# Altium PCB Sound_Sensor_v3.0.PcbDoc (part 3 of 3)
Units mil, origin at the board's own origin, x right, y up, seen from the top; angles counter-clockwise.
Board outline 3553.2 x 3464.87 mil, 2 copper layers (Top Layer, Bottom Layer), stack 57 mil thick; 83 components, 60 nets, 303 pads, 73 vias.
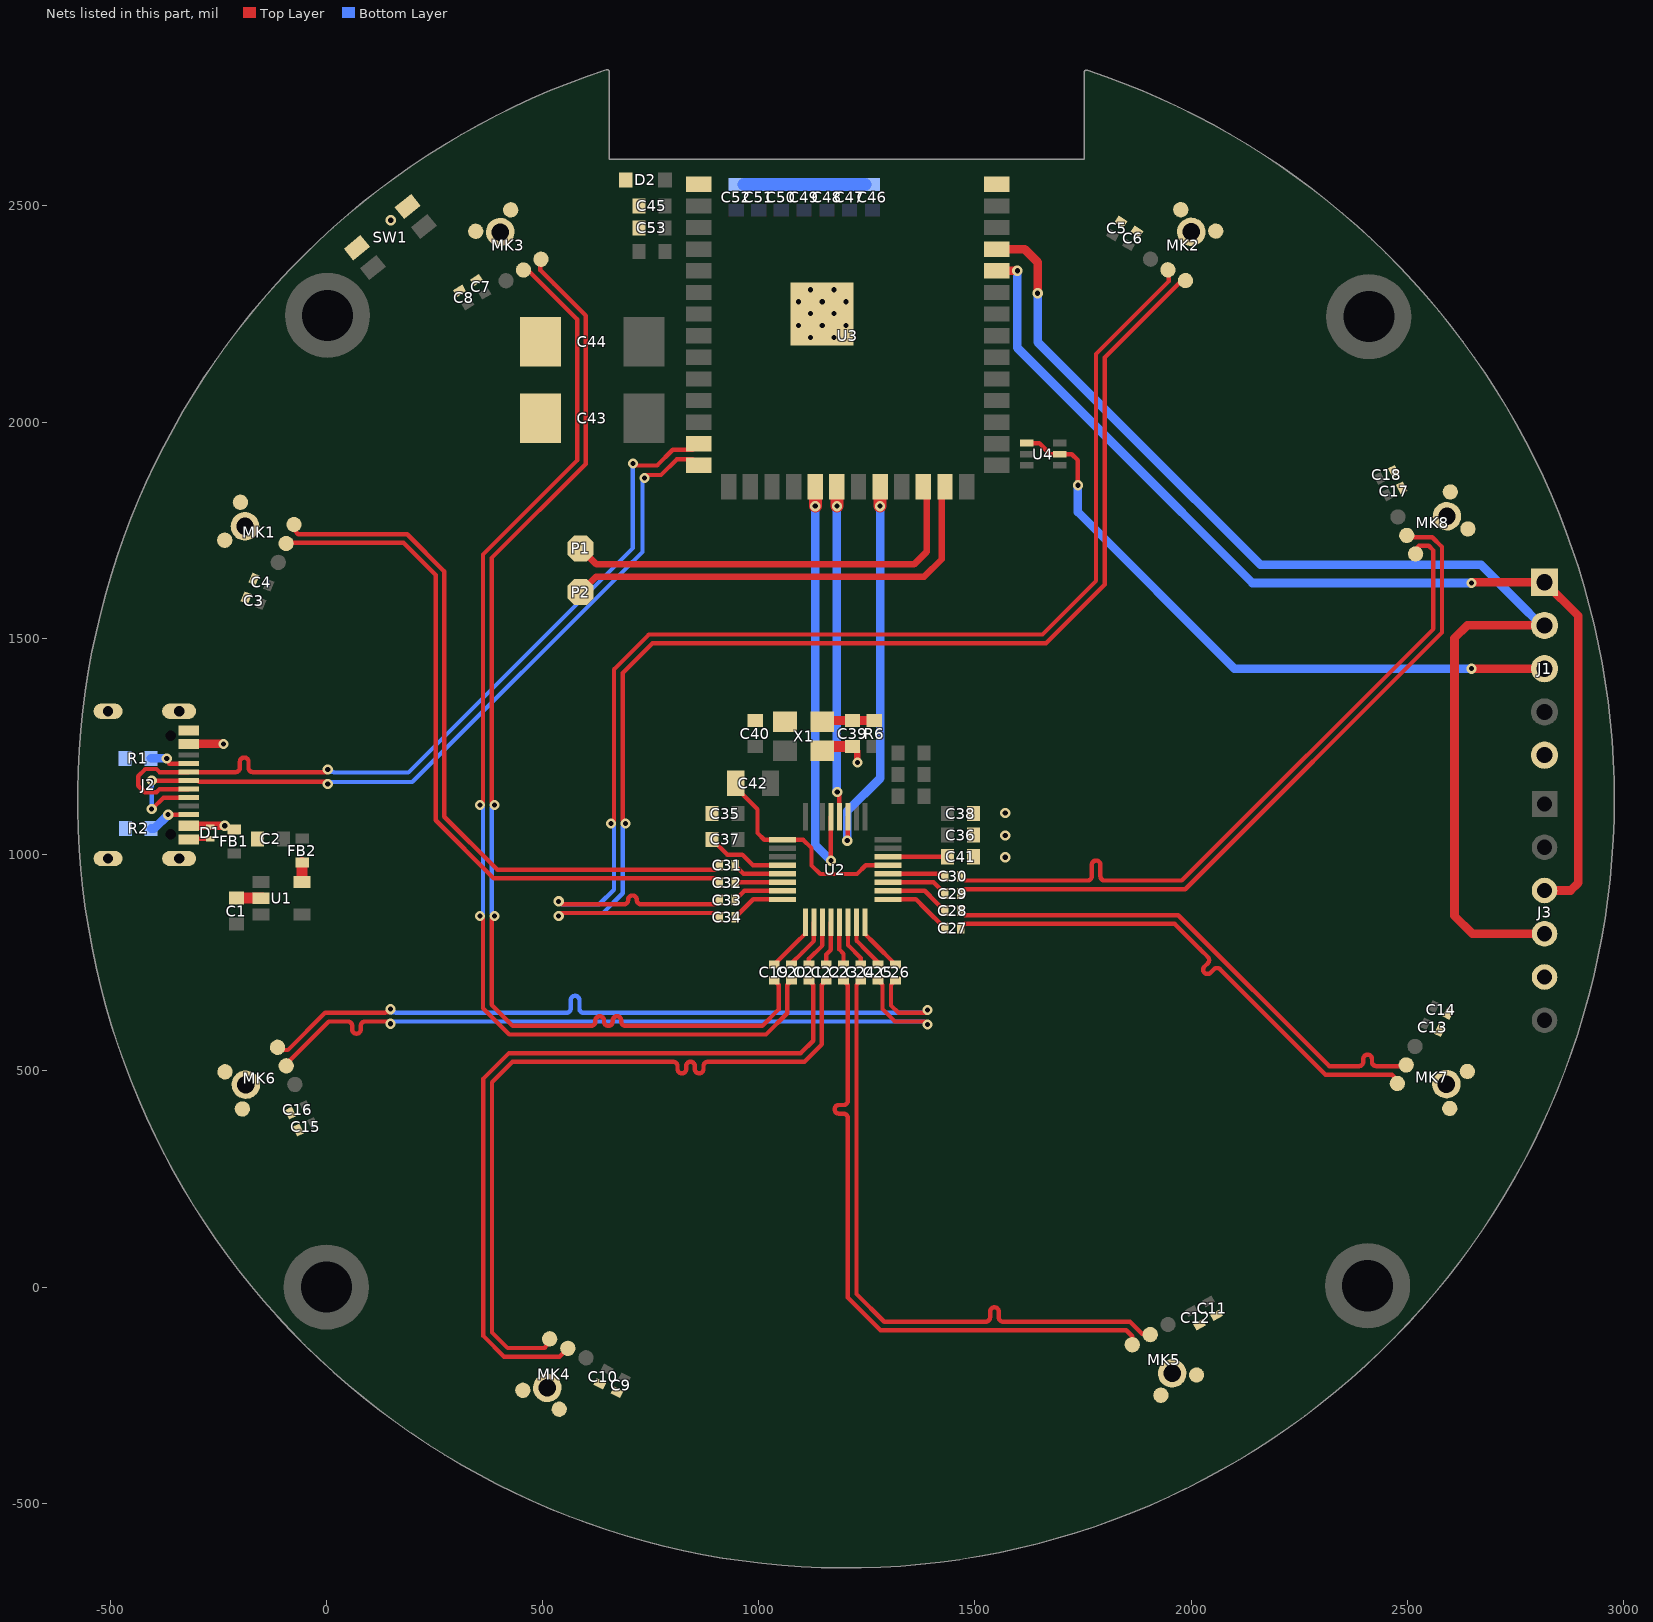
[diagram p2: the nets of this part, all layers, seen from the top]

## Via types
v1: diameter 23.62, hole 11.81, Top Layer to Bottom Layer, 73 vias

## Nets (pads, with @x,y where several pads share a name; then routed paths per layer and width w, separated by ;. In a path a pad name is that pad's centre, name@x,y a point inside that pad or via, vN(x,y) a via of type N, cw(c..) or ccw(c..) an arc to the next point about the centre after c; other vN are vias at no path point) (continued)
GND: C1.2 C2.2 C3.2 C4.2 C5.2 C6.2 C7.2 C8.2 C9.2 C10.2 C11.2 C12.2 C13.2 C14.2 C15.2 C16.2 C17.2 C18.2 C35.2 C36.2 C37.2 C38.2 C39.1 C40.1 C41.2 C42.1 C43.2 C44.2 C45.2 C46.2 C47.2 C48.2 C49.2 C50.2 C51.2 C52.2 C53.2 D1.1 D2.2 J1.5 J2.A1/B12 J2.B1/A12 J2.S1 J2.S2 J2.S3 J2.S4 J3.5 MK1.2 MK1.3 MK1.4 MK2.2 MK2.3 MK2.4 MK3.2 MK3.3 MK3.4 MK4.2 MK4.3 MK4.4 MK5.2 MK5.3 MK5.4 MK6.2 MK6.3 MK6.4 MK7.2 MK7.3 MK7.4 MK8.2 MK8.3 MK8.4 R1.1 R2.1 SW1.2 U1.2 U2.13 U2.25 U2.28 U3.1 U3.40 U3.41 X1.2 X1.4 | length 1158.8
  Top Layer w10: J2.B1/A12@-313.25,1036.94 D1.1@-264.8,1036.94 ; C37.2@892,1035 927,1000 962,1000 986.61,975.39 U2.28@1054.64,975.39 ; C42.1@947,1155 997,1105 997,1050 1012.55,1034.45 U2.25@1054.64,1034.45 1102.55,1034.45 1122,1015 1122,975 1142,955 1227,955 1247.39,975.39 U2.13@1298.73,975.39
  Top Layer w15: C39.1@1217,1250 1228.34,1238.66 v1(1228.34,1213)
  Top Layer w25: -190.29,899.72 U1.2@-148.21,899.72 ; X1.4@1156.41,1250 C39.1@1217,1250
  Bottom Layer w30: 965.5,2550 C51.2@1000,2550 C50.2@1052,2550 C49.2@1105,2550 C48.2@1158,2550 C47.2@1210,2550 C46.2@1245.5,2550
  other v1: 1570,994 1570,1044 1570,1096 1119.23,2195.88 1174.35,2195.88 1091.67,2223.44 1146.79,2223.44 1201.91,2223.44 1119.23,2251 1174.35,2251 1091.67,2278.56 1146.79,2278.56 1201.91,2278.56 1119.23,2306.12 1174.35,2306.12 149,2467
IO19: P1.1 U3.24 | length 970.8
  Top Layer w15: P1.1@588,1707.98 624.98,1671 682,1671 1359,1671 1388,1700 U3.24@1388,1843.5
IO20: P2.1 U3.25 | length 1026.6
  Top Layer w15: P2.1@588,1607 624,1643 695,1643 1383,1643 1423,1683 U3.25@1423,1843.08
MIC_OUTS.OUT1_N: C32.1 MK1.6 | length 1659.9
  Top Layer w10: MK1.6@-92.86,1719.58 -91.45,1720.98 178.73,1720.98 253,1646.72 253,1079.31 387.31,945 898.5,945 C32.1@908.5,935
MIC_OUTS.OUT1_P: C31.1 MK1.1 | length 1657.1
  Top Layer w10: MK1.1@-74.72,1763.37 -72.01,1756.84 -72.01,1748.32 -64.68,1740.98 187.02,1740.98 273,1655 273,1087.59 395.59,965 461.71,965 530.48,965 898.5,965 C31.1@908.5,975
MIC_OUTS.OUT2_N: C33.1 MK2.6 | length 3050.7
  Top Layer w10: v1(537.32,891.98) 544.13,885.17 548.43,885.17 548.6,885 682.99,885 687.99,885 ccw(c687.99,895) 697.99,895 697.99,895.65 cw(c707.99,895.65) 717.99,895.65 717.99,895 ccw(c727.99,895) 727.99,885 769.28,885 898.5,885 C33.1@908.5,895 ; v1(658.51,1071.98) 665.32,1078.8 665.32,1428.32 746,1509 1656,1509 1780,1633 1780,2157.66 1947.84,2325.5 1947.84,2345.33 MK2.6@1946.19,2352.2
  Bottom Layer w10: v1(537.32,891.98) 544.13,885.17 548.43,885.17 548.6,885 631.34,885 665.32,918.98 665.32,1022.98 665.32,1065.17 v1(658.51,1071.98)
MIC_OUTS.OUT2_P: C34.1 MK2.1 | length 3055
  Top Layer w10: v1(537.32,858.36) 537.32,865.17 540.14,865.17 540.32,865 898.5,865 C34.1@908.5,855 ; v1(692.13,1071.98) 685.32,1078.8 685.32,1420.04 754.28,1489 1664.28,1489 1800,1624.72 1800,2149.38 1976.41,2325.78 1979.73,2325.78 MK2.1@1986.6,2327.44
  Bottom Layer w10: v1(537.32,858.36) 537.32,865.17 540.14,865.17 540.32,865 639.62,865 685.32,910.7 685.32,1065.17 v1(692.13,1071.98)
MIC_OUTS.OUT3_N: C20.1 MK3.6 | length 2694.5
  Top Layer w10: v1(355.51,857.98) 362.32,851.17 362.32,644.7 423.04,583.98 1016.61,583.98 1066,633.38 1066,699 C20.1@1076,709 ; v1(355.51,1114.98) 362.32,1121.8 362.32,1693.98 580,1911.66 580,2238.02 518.04,2299.98 467.82,2350.2 462.89,2350.2 MK3.6@456.02,2351.85
  Bottom Layer w10: v1(355.51,857.98) 362.32,864.8 362.32,1108.17 v1(355.51,1114.98)
MIC_OUTS.OUT3_P: C19.1 MK3.1 | length 2701.8
  Top Layer w10: v1(389.13,857.98) 382.32,851.17 382.32,652.98 431.32,603.98 570.18,603.98 612.15,603.98 ccw(c612.15,613.98) 622.15,613.98 622.15,616.27 cw(c632.15,616.27) 642.15,616.27 642.15,613.98 ccw(c652.15,613.98) 662.15,613.98 662.15,616.27 cw(c672.15,616.27) 682.15,616.27 682.15,613.98 ccw(c692.15,613.98) 692.15,603.98 717.15,603.98 1008.32,603.98 1046,641.66 1046,699 C19.1@1036,709 ; v1(389.13,1114.98) 382.32,1121.8 382.32,1685.7 600,1903.38 600,2246.31 526.32,2319.98 494.78,2351.52 494.78,2369.74 MK3.1@496.43,2376.62 MK3.1@503.31,2374.97
  Bottom Layer w10: v1(389.13,857.98) 382.32,864.8 382.32,1108.17 v1(389.13,1114.98)
MIC_OUTS.OUT4_N: C21.1 MK4.6 | length 1760.8
  Top Layer w10: MK4.6@558.56,-141.63 539.17,-161.02 497.08,-161.02 411.04,-161.02 363.32,-113.3 363.32,481.98 422.32,540.98 1097.32,540.98 1126,569.66 1126,699 C21.1@1116,709
MIC_OUTS.OUT4_P: C22.1 MK4.1 | length 1762.7
  Top Layer w10: MK4.1@516.51,-119.74 505.44,-141.02 419.32,-141.02 383.32,-105.02 383.32,473.7 430.61,520.98 777.19,520.98 802.19,520.98 cw(c802.19,510.98) 812.19,510.98 812.19,504.34 ccw(c822.19,504.34) 832.19,504.34 832.19,510.98 cw(c842.19,510.98) 852.19,510.98 852.19,504.34 ccw(c862.19,504.34) 872.19,504.34 872.19,510.98 cw(c882.19,510.98) 882.19,520.98 927,520.98 1105.61,520.98 1146,561.38 1146,699 C22.1@1156,709
MIC_OUTS.OUT5_N: C24.1 MK5.6 | length 1495.9
  Top Layer w10: C24.1@1236,709 1226,699 1226,-16 1290,-80 1507.45,-80 1525,-80 ccw(c1525,-70) 1535,-70 1535,-56.79 cw(c1545,-56.79) 1555,-56.79 1555,-70 ccw(c1565,-70) 1565,-80 1590,-80 1858.28,-80 1886.35,-108.06 1898.28,-108.06 MK5.6@1905.09,-109.95
MIC_OUTS.OUT5_P: C23.1 MK5.1 | length 1495.8
  Top Layer w10: C23.1@1196,709 1206,699 1206,456.09 1206,431.09 cw(c1196,431.09) 1196,421.09 1185.41,421.09 ccw(c1185.41,411.09) 1185.41,401.09 1196,401.09 cw(c1196,391.09) 1206,391.09 1206,370 1206,-24.28 1281.72,-100 1850,-100 1863.84,-113.84 MK5.1@1863.84,-133.29
MIC_OUTS.OUT6_N: C25.1 MK6.6 | length 1763.2
  Top Layer w10: MK6.6@-92.66,511.52 -90.24,518.17 -90.24,518.42 5.51,614.17 24.78,614.17 49.78,614.17 cw(c49.78,604.17) 59.78,604.17 59.78,595.91 ccw(c69.78,595.91) 79.78,595.91 79.78,604.17 cw(c89.78,604.17) 89.78,614.17 118.57,614.17 143.13,614.17 v1(148.32,608.98) ; C25.1@1276,709 1286,699 1286,643.02 1314.85,614.17 1383.51,614.17 v1(1390.32,607.36)
  Bottom Layer w10: v1(148.32,608.98) 153.51,614.17 1383.51,614.17 v1(1390.32,607.36)
MIC_OUTS.OUT6_P: C26.1 MK6.1 | length 1776.2
  Top Layer w10: MK6.1@-112.69,554.48 -106.05,552.07 -102.11,548.13 -88.82,548.13 -2.77,634.17 135.6,634.17 137.22,635.8 148.32,635.8 v1(148.32,642.61) ; C26.1@1316,709 1306,699 1306,651.31 1323.13,634.17 1383.51,634.17 v1(1390.32,640.98)
  Bottom Layer w10: v1(148.32,642.61) 148.32,635.8 159.43,635.8 161.05,634.17 513.06,634.17 555.32,634.17 ccw(c555.32,644.17) 565.32,644.17 565.32,663.57 cw(c575.32,663.57) 585.32,663.57 585.32,644.17 ccw(c595.32,644.17) 595.32,634.17 620.32,634.17 1383.51,634.17 v1(1390.32,640.98)
MIC_OUTS.OUT7_N: C28.1 MK7.6 | length 1215.1
  Top Layer w10: C28.1@1467,870 1477,860 1970,860 2319.02,510.98 2382.93,510.98 2387.93,510.98 ccw(c2387.93,520.98) 2397.93,520.98 2397.93,527.44 cw(c2407.93,527.44) 2417.93,527.44 2417.93,520.98 ccw(c2427.93,520.98) 2427.93,510.98 2454.36,510.98 2490.21,510.98 2490.5,511.27 MK7.6@2497.16,513.63
MIC_OUTS.OUT7_P: C27.1 MK7.1 | length 1215.9
  Top Layer w10: C27.1@1467,830 1477,840 1961.72,840 2020.86,780.86 2038.54,763.18 cw(c2031.46,756.11) 2038.54,749.04 2030.63,741.13 ccw(c2037.7,734.06) 2030.63,726.99 ccw(c2037.7,734.06) 2044.77,726.99 2052.68,734.9 cw(c2059.75,727.82) 2066.82,734.9 2081.65,720.07 2310.73,490.98 2464.32,490.98 2474.39,480.91 2474.39,477.51 MK7.1@2476.75,470.84
MIC_OUTS.OUT8_N: C29.1 MK8.6 | length 1652.9
  Top Layer w10: C29.1@1467,910 1477,920 1986.28,920 2580,1513.72 2580,1711.59 2557.61,1733.98 2506.96,1733.98 2505.17,1735.78 MK8.6@2498.5,1738.14
MIC_OUTS.OUT8_P: C30.1 MK8.1 | length 1654.2
  Top Layer w10: C30.1@1467,950 1477,940 1755,940 1760,940 ccw(c1760,950) 1770,950 1770,976.43 cw(c1780,976.43) 1790,976.43 1790,950 ccw(c1800,950) 1800,940 1819.3,940 1978,940 2560,1522 2560,1703.31 2549.32,1713.98 2526.75,1713.98 2521.27,1708.51 2521.27,1702.02 MK8.1@2518.91,1695.36
MISO: U2.20 U3.20 | length 759.4
  Top Layer w10: v1(1181.53,1145) 1186.53,1140 U2.20@1186.53,1087.6
  Top Layer w30: v1(1180.71,1805.71) U3.20@1180.71,1850.79
  Bottom Layer w20: v1@1180.71,1150.82 v1(1180.71,1805.71)
MOSI: U2.21 U3.19 | length 970.6
  Top Layer w10: v1@1166.84,996.84 U2.21@1166.84,1087.6
  Top Layer w30: v1(1130.71,1805.71) U3.19@1130.71,1850.79
  Bottom Layer w20: v1(1130.71,1805.71) 1130.71,1022.29 v1(1167,986)
NetC19_2: C19.2 U2.1 | length 101.5
  Top Layer w10: C19.2@1036,746 1085,795 U2.1@1107.79,817.79
NetC20_2: C20.2 U2.2 | length 115.8
  Top Layer w10: C20.2@1076,749 1102,775 1127.47,800.47 U2.2@1127.47,843.5
NetC21_2: C21.2 U2.3 | length 110.4
  Top Layer w10: C21.2@1116,746 1116,759 1147.16,790.16 U2.3@1147.16,843.5
NetC22_2: C22.2 U2.4 | length 102
  Top Layer w10: C22.2@1156,746 1156,769 1166.84,779.84 U2.4@1166.84,843.5
NetC23_2: C23.2 U2.5 | length 101.4
  Top Layer w10: U2.5@1186.53,843.5 1186.53,780.47 1196,771 C23.2@1196,746
NetC24_2: C24.2 U2.6 | length 109.8
  Top Layer w10: U2.6@1206.21,843.5 1206.21,790.79 1236,761 C24.2@1236,746
NetC25_2: C25.2 U2.7 | length 113.3
  Top Layer w10: U2.7@1225.9,843.5 1225.9,801.1 1251.5,775.5 C25.2@1276,751
NetC26_2: C26.2 U2.8 | length 99.6
  Top Layer w10: U2.8@1245.58,816.42 1267,795 C26.2@1316,746
NetC27_2: C27.2 U2.9 | length 158.9
  Top Layer w10: U2.9@1298.73,896.65 1363.35,896.65 1385,875 C27.2@1430,830
NetC28_2: C28.2 U2.10 | length 150.5
  Top Layer w10: U2.10@1298.73,916.34 1383.66,916.34 1410,890 C28.2@1430,870
NetC29_2: C29.2 U2.11 | length 142
  Top Layer w10: U2.11@1298.73,936.02 1403.98,936.02 C29.2@1430,910
NetC30_2: C30.2 U2.12 | length 125.6
  Top Layer w10: U2.12@1298.73,955.71 C30.2@1424.29,955.71
NetC31_2: C31.2 U2.29 | length 117.1
  Top Layer w10: C31.2@945.5,975 964.79,955.71 U2.29@1054.64,955.71
NetC32_2: C32.2 U2.30 | length 108.1
  Top Layer w10: C32.2@946.52,936.02 U2.30@1054.64,936.02
NetC33_2: C33.2 U2.31 | length 118
  Top Layer w10: C33.2@945.5,895 966.84,916.34 U2.31@1054.64,916.34
NetC34_2: C34.2 U2.32 | length 100.4
  Top Layer w10: C34.2@945.5,855 987.15,896.65 U2.32@1028.65,896.65
NetC39_2: C39.2 R6.2 X1.1 | length 117.5
  Top Layer w20: X1.1@1149.48,1310 C39.2@1217,1310 R6.2@1267,1310
NetFB2_1: FB2.1 U1.5 | length 45
  Top Layer w25: U1.5@-56.29,936.46 FB2.1@-56.29,981.42
NetJ2_A5: J2.A5 R1.2 | length 101.1
  Top Layer w10: v1(-368.8,1222.48) -370.8,1222.48 -372.8,1220.48 -362.79,1210.47 J2.A5@-317.67,1210.47
  Bottom Layer w20: R1.2@-405.8,1222.47 v1(-368.8,1222.48)
NetJ2_B5: J2.B5 R2.2 | length 100.3
  Top Layer w10: v1(-365.68,1092.36) J2.B5@-317.67,1092.36
  Bottom Layer w20: R2.2@-404.8,1060.46 -397.58,1060.46 v1(-365.68,1092.36)
REFIN: C41.1 U2.14 | length 138.2
  Top Layer w10: U2.14@1298.73,995.08 C41.1@1436.92,995.08
RTS: J1.3 U4.1 U4.5 | length 1483.5
  Top Layer w10: U4.1@1619.81,1951.59 1648.41,1951.59 1674,1926 U4.5@1696.19,1926 1724,1926 1738,1912 v1(1738,1854)
  Top Layer w20: v1(2648,1430) J1.3@2817.01,1430
  Bottom Layer w20: v1(1738,1854) 1738,1792 2100,1430 v1(2648,1430)
RX: J1.1 J3.3 U3.36 | length 2484.2
  Top Layer w20: U3.36@1550,2350 v1(1598,2350) ; v1(2648,1628.19) 2648.98,1628.19 2650.79,1630 J1.1@2817.01,1630 2895.32,1551.69 2895.32,934.98 2877.35,917.01 J3.3@2817.01,917.01
  Bottom Layer w20: v1(1598,2350) 1598,2172 1820,1950 2141.81,1628.19 v1(2648,1628.19)
SCLK: U2.19 U3.22 | length 903.9
  Top Layer w10: v1@1205.48,1032.98 U2.19@1205.48,1086.87
  Top Layer w30: v1(1280.71,1805.71) U3.22@1280.71,1850.79
  Bottom Layer w20: v1(1204.75,1032.25) 1204.75,1100.75 1280.71,1176.71 v1(1280.71,1805.71)
TX: J1.2 J3.4 U3.37 | length 2823.4
  Top Layer w20: U3.37@1550,2400 1615,2400 1645,2370 v1(1645,2298) ; J3.4@2817.01,817.01 2650.3,817.01 2609,858.31 2609,1500.66 2638.34,1530 J1.2@2817.01,1530
  Bottom Layer w15: J1.2@2810,1530 J1.2@2817.01,1530
  Bottom Layer w20: v1(1645,2298) 1645,2185 1860,1970 2160,1670 2670,1670 2755,1585 J1.2@2810,1530
USB.USB_N: J2.A7 J2.B7 U3.13 | length 1919.5
  Top Layer w10: J2.A7@-317.67,1151.42 -385.63,1151.42 -392.69,1144.36 -419.67,1144.36 -434.8,1159.48 -434.8,1181.48 -418.3,1197.98 -392.69,1197.98 -385.5,1190.79 J2.B7@-317.67,1190.79 ; -294.05,1190.8 -214.86,1190.8 -209.86,1190.8 ccw(c-209.86,1200.8) -199.86,1200.8 -199.86,1214.62 cw(c-189.86,1214.62) -179.86,1214.62 -179.86,1200.8 ccw(c-169.86,1200.8) -169.86,1190.8 -151.6,1190.8 -2.49,1190.8 v1(3.32,1196.61) ; v1(709,1904.62) 713.81,1899.81 720.93,1899.81 765.04,1899.81 801.23,1936 847.02,1936 U3.13@861.02,1950
  Bottom Layer w10: v1(3.32,1196.61) 8.13,1191.8 15.26,1191.8 17.26,1189.8 189.8,1189.8 709,1709 v1(709,1904.62)
USB.USB_P: J2.A6 J2.B6 U3.14 | length 1829.8
  Top Layer w10: v1(-403.8,1171.17) -403.14,1171.82 -402.42,1171.1 J2.A6@-317.67,1171.1 ; v1@-402.8,1105.48 -376.54,1131.73 J2.B6@-317.67,1131.73 ; -294.05,1168.8 -2.49,1168.8 v1(3.32,1162.98) ; v1(735.81,1871) 735.81,1877.81 774.15,1877.81 810.34,1914 847.02,1914 U3.14@861.02,1900
  Bottom Layer w10: v1(-403.8,1105.48) v1(-403.8,1171.17) ; v1(3.32,1162.98) 3.32,1167.8 198.91,1167.8 709,1677.89 731,1699.89 731,1871 v1(735.81,1871)
VBUS: D1.2 FB1.1 J2.A4/B9 J2.B4/A9 | length 152.5
  Top Layer w20: J2.B4/A9@-314.68,1067.01 -264.8,1067.01 v1@-238.8,1067.01 ; J2.A4/B9@-314.68,1255.98 v1@-238.07,1255.98
  other v1: -234.8,1066.72 -237.8,1255.72
pads on no net: J2.A8 J2.B8 J2.MH U1.4 U2.27 U3.4 U3.5 U3.6 U3.7 U3.8 U3.9 U3.10 U3.11 U3.12 U3.15 U3.16 U3.23 U3.26 U3.28 U3.29 U3.30 U3.31 U3.32 U3.33 U3.34 U3.35 U3.38 U3.39

## Polygon pours and split planes (outlines as drawn)
no net on Bottom Overlay "NONET_L-01_P-001" (solid): 1125.98,447.59 cw(c1002.43,44.62) 1413.98,135.59 cw(c1774.85,0.77) 1534.2,301.59 1533.98,302.59 1519.86,422.59 1425.92,322.59 1424.98,321.59 ccw(c615.16,-321.74) 1212.48,522.59
no net on Bottom Overlay "NONET_L-01_P-001" (solid): 1243.71,109.54 ccw(c1372,299) 1143.8,315.66 1165.78,313.59 cw(c1372,299) 1269.28,119.59
GND on Top Layer "GND_L01_P001" (solid, remove dead copper, pour order 1): 625,2760.71 ccw(c1201.18,1127.06) 1785,2758 1785,2575 625,2575
GND on Bottom Layer "GND_L02_P000" (solid, remove dead copper, pour order 0): 625.32,2760.71 ccw(c1201.5,1127.06) 1785.32,2758 1785.32,2575 625.32,2575

## Other copper
Top Layer:
  rectangle net 3V3: 635,1951.93 735.08,2395
  region net 3V3: 192.23,1108.77 160.5,1140.5 120,1100 151.73,1068.27
  rectangle net 3V3: 697,1981 773,2214
  region net GND: 1949,2446 1848.54,2507.56 1828.67,2475.14 1929.13,2413.58
  region net GND: 2491.78,1829.52 2554.7,1859.53 2523,1926 2460.08,1895.99
  region net GND: 2631,1851 2581.73,1954.29 2511.14,1920.62 2560.4,1817.33
  region net GND: 1904.49,2463.99 1845.05,2500.42 1825.18,2467.99 1884.62,2431.57
  region net GND: 374.13,2398.42 273.47,2336.74 293.34,2304.32 394,2366
  region net GND: 340.12,2364.73 279.2,2327.39 299.07,2294.97 359.99,2332.31
  region net GND: -186.13,1708.55 -231.23,1599.66 -196.1,1585.11 -151,1694
  region net GND: -194.44,1662.18 -221.93,1595.81 -186.8,1581.26 -159.31,1647.63
  region net GND: -148.46,435.93 -100.1,332.22 -65.64,348.29 -114,452
  region net GND: -57.54,352.07 -87,415.25 -121.46,399.18 -92,336
  region net GND: 659.87,-294.88 558.36,-242.04 522.25,-311.42 623.75,-364.26
  region net GND: 683.4,-248.46 621.56,-216.27 587.56,-281.59 649.39,-313.78
  region net GND: 2026.96,-126.35 2087.63,-92.02 2068.91,-58.93 2008.23,-93.26
  region net GND: 1991.72,-155.1 2091.32,-98.74 2072.6,-65.65 1973,-122
  region net GND: 2592,522 2641.27,625.29 2606.94,641.66 2557.68,538.37
  rectangle net GND: -324.8,1295.29 -307.55,1334.54
  region net "DEBUG SIG.ENABLE": 226.97,2472.33 83.67,2356.29 133.73,2294.47 277.02,2410.51
  region net 3V3: 418.51,2334.93 316.19,2272.23 337.09,2238.13 439.41,2300.83
  region net GND: 426.6,2531.22 309.64,2459.54 374.32,2353.98 491.28,2425.66
  region net GND: -221.56,1847.1 -274.06,1720.36 -159.68,1672.98 -107.18,1799.72
  region net 3V3: -113.71,1683.16 -159.63,1572.29 -95.42,1545.7 -49.5,1656.56
  region net 3V3: -81.11,472.48 -31.04,365.11 54.07,404.81 4.01,512.17
  region net GND: -273.88,502.66 -215.91,378.34 -103.7,430.66 -161.68,554.98
  region net GND: 1928.32,-290.02 2047.71,-222.47 1986.75,-114.71 1867.36,-182.26
  region net 3V3: 1947.58,-92.92 2054.75,-32.28 1982.52,95.37 1875.35,34.74
  region net GND: 2603.46,565.47 2633.47,628.39 2599.15,644.76 2569.14,581.84
  region net 3V3: 2518.77,546.45 2571.97,658 2507.54,688.73 2454.33,577.19
  region net GND: 2619.07,379.69 2678.12,503.5 2566.38,556.8 2507.32,432.98
  region net GND: 420.75,-258.48 542.43,-321.82 578.41,-252.68 456.74,-189.34
  region net 3V3: 588.88,-165.61 695.32,-221.02 741.31,-132.67 634.87,-77.26
  region net 3V3: 2485.96,1774.73 2434.3,1883.04 2370.21,1852.46 2421.87,1744.15
  region net GND: 2679.32,1748.98 2620.27,1872.8 2549.42,1839.01 2608.48,1715.19
  region net GND: 2092.32,2458.98 1975.36,2530.66 1910.67,2425.1 2027.64,2353.43
  region net 3V3: 1914.61,2380.17 1812.3,2442.87 1775.76,2383.24 1878.07,2320.54
  region net GND: 168.73,2500.15 66.26,2417.17 83.07,2396.4 185.55,2479.38
  rectangle net 3V3: 1367,1033 1452,1245
  rectangle net GND: 1073.62,2177.17 1219.29,2322.83
  rectangle net VBUS: -237.68,1046.22 -197.04,1080.98
  rectangle net 5V: -222.8,824.72 -100.8,856.72
  rectangle net 3V3: -110.8,1025.24 -44.68,1103
  rectangle net 5V: -225.8,935.72 -100.8,997.72
  rectangle net GND: -324.8,983.54 -307.55,1027.72
Bottom Layer:
  rectangle net VBUS: -258.8,1048.72 -216.8,1272.72

## Silkscreen, mask and mechanical layers (free items; w line width, h text height)
Top Overlay:
  region: 2590.99,885 2545.02,930.97 2545.02,839.03
  region: 2589.99,1450 2544.02,1495.97 2544.02,1404.03
  lines w5: -147.8,1015.48 -111.8,1015.48 ; -147.8,1057.48 -133.8,1057.48 -111.8,1057.48 ; -133.8,1060.48 -133.8,1105.48 -113.8,1105.48 ; 853,1042 873,1042 873,1035 ; 870,983 896,983 896,975 ; 881,931 896,931 896,935 ; 884,889 896,889 896,895 ; 958,855 980,855 980,832 ; 988,684 988,706.5 1020,706.5 ; 1116,696.5 1118,696.5 1118,568 ; 1196,696.5 1198,696.5 1198,568 ; 1276,696.5 1278.02,696.5 1278.02,686 ; 1315,696.5 1316,696.5 ; 1332,706.5 1363,706.5 ; 1386.08,1256 1387,1256 1387,1270 1417,1270 ; 1400,1143.52 1417,1143.52 ; 1400,1197.39 1416,1197.39 ; 1479.5,905 1617,905 ; 1479.5,941.34 1479.5,940 1494,940
  lines w10: 391,1545 651,1545 651,1775 391,1775 391,1545
  lines w20: 2390.02,1450 2544.02,1450 ; 2391.02,885 2545.02,885
  text "RX" at 2677.69,1599.31 h40
  text "TX" at 2677.69,1499.31 h40
  text "RTS" at 2660.1,1399.31 h40
  text "TEST POINTs" at 361,1395 h90
  text "DTR" at 2655.76,1299.31 h40
  text "GND" at 2649.07,1199.31 h40
  text "PROGRAMMING" at 2389.32,1122.98 h90 r90
  text "EN" at 2655.01,1092 h40
  text "IO_0" at 2653.1,986.31 h40
  text "RX" at 2678.01,892 h40
  text "USB" at -391.8,793.48 h90 r90
  text "TX" at 2678.01,789 h40
  text "DEBUG" at 2389.32,723.98 h90 r90
  text "GND" at 2650.01,686 h40
  text "3V3" at 2650.01,586 h40
Bottom Overlay:
  lines w5: 1424.98,321.59 ccw(c615.16,-321.74) 1212.48,522.59 1125.98,447.59 cw(c1002.43,44.62) 1413.98,135.59 cw(c1774.85,0.77) 1534.2,301.59 ; 1425.92,322.59 1519.86,422.59 1533.98,302.59 ; 1143.8,315.66 cw(c1372,299) 1243.71,109.54 1269.28,119.59 ccw(c1372,299) 1165.78,313.59 1143.8,315.66
  lines w10: 2763,567 2867,567 2867,1172 2763,1172 2763,567 ; 2763,1185 2867,1185 2867,1680 2763,1680 2763,1185
  text "RX" at 2766.69,1600.31 h40
  text "TX" at 2766.69,1500.31 h40
  text "RTS" at 2766.69,1400.31 h40
  text "DTR" at 2766.69,1300.31 h40
  text "GND" at 2766.69,1200.31 h40
  text "EN" at 2768.01,1092 h40
  text "IO_0" at 2767.69,987.31 h40
  text "RX" at 2767.01,892 h40
  text "TX" at 2767.01,790 h40
  text "GND" at 2767.01,685 h40
  text "3V3" at 2767.01,585 h40
  text "RoHS" at 1295.48,213.66 h236.22
  text "compliant" at 1292.48,132.44 h125.98
  text "ZERO CARBON FOOTPRINT" at 1638.48,8.59 h40
DIMENSION:
  text "PCB Diameter" at -2810,594.59 h236.22
BOARD OUTLINE:
  lines w10: 648.96,2810.29 ccw(c1201.69,1127.06) 1757.83,2809.17 ; 649.15,2810.29 649.15,2603 1570,2603 ; 1560.79,2603 1757.64,2603 ; 1560.98,2603 1757.83,2603 1757.83,2809.29
FABRICATION:
  drawing of 191 lines, arcs and shapes, not listed
  text "Layer" at -732.66,3923 h60
  text "Name" at -322.74,3923 h60
  text "Material" at 607,3923 h60
  text "Thickness" at 1466.77,3923 h60
  text "Constant" at 2116.6,3923 h60
  text "Board Layer Stack" at 2686.46,3923 h60
  text "Top Overlay" at -322.74,3803 h60
  text "Top Solder" at -322.74,3683 h60
  text "Solder Resist" at 607,3683 h60
  text "0.076mm" at 1466.77,3683 h60
  text "3.5" at 2116.6,3683 h60
  text "1" at -732.66,3563 h60
  text "Top Layer" at -322.74,3563 h60
  text "0.254mm" at 1466.77,3563 h60
  text "Dielectric 1" at -322.74,3443 h60
  text "FR-4" at 607,3443 h60
  text "0.940mm" at 1466.77,3443 h60
  text "4.8" at 2116.6,3443 h60
  text "2" at -732.66,3323 h60
  text "Bottom Layer" at -322.74,3323 h60
  text "0.254mm" at 1466.77,3323 h60
  text "Bottom Solder" at -322.74,3203 h60
  text "Solder Resist" at 607,3203 h60
  text "0.076mm" at 1466.77,3203 h60
  text "3.5" at 2116.6,3203 h60
  text "Bottom Overlay" at -322.74,3083 h60
  text "Total board thickness:" at -732.66,2963 h60
  text "1.600mm" at 1466.77,2963 h60
Drill Drawing:
  circle w10: c-701.38,4687.27 r33.33
  lines w10: -734.71,4570.61 -668.04,4570.61 -701.38,4503.94 -734.71,4570.61 ; -734.71,4803.94 -701.38,4820.61 -668.04,4803.94 -684.71,4837.27 -668.04,4870.61 -701.38,4853.94 -734.71,4870.61 -718.04,4837.27 -734.71,4803.94 ; -734.71,4970.61 -718.04,4970.61 -701.38,4953.94 -684.71,4970.61 -668.04,4970.61 -684.71,4987.27 -668.04,5003.94 -684.71,5003.94 -701.38,5020.61 -718.04,5003.94 -734.71,5003.94 -718.04,4987.27 -734.71,4970.61 ; -734.71,5103.94 -668.04,5103.94 -668.04,5170.61 -734.71,5170.61 -734.71,5103.94 ; -734.71,5270.61 -718.04,5270.61 -718.04,5253.94 -684.71,5253.94 -684.71,5270.61 -668.04,5270.61 -668.04,5303.94 -684.71,5303.94 -684.71,5320.61 -718.04,5320.61 -718.04,5303.94 -734.71,5303.94 -734.71,5270.61 ; -734.71,5403.94 -734.71,5420.61 -718.04,5437.27 -734.71,5453.94 -734.71,5470.61 -718.04,5470.61 -701.38,5453.94 -684.71,5470.61 -668.04,5470.61 -668.04,5453.94 -684.71,5437.27 -668.04,5420.61 -668.04,5403.94 -684.71,5403.94 -701.38,5420.61 -718.04,5403.94 -734.71,5403.94 ; -734.71,5587.27 -701.38,5553.94 -668.04,5587.27 -701.38,5620.61 -734.71,5587.27
  lines w15: -794.5,4458.94 9172.72,4458.94 ; -794.5,5658.94 9172.72,5658.94 ; -243.62,4308.94 -243.62,5808.94 ; 346.22,4308.94 346.22,5808.94 ; 1465.89,4308.94 1465.89,5808.94 ; 1971.77,4308.94 1971.77,5808.94 ; 2705.57,4308.94 2705.57,5808.94 ; 4205.12,4308.94 4205.12,5808.94 ; 4794.97,4308.94 4794.97,5808.94 ; 5540.77,4308.94 5540.77,5808.94 ; 6680.44,4308.94 6680.44,5808.94 ; 7770.12,4308.94 7770.12,5808.94 ; -794.5,4308.94 9172.72,4308.94 9172.72,5808.94 -794.5,5808.94 -794.5,4308.94
  text "Symbol" at -704.5,5703.94 h72
  text "Count" at -198.62,5703.94 h72
  text "Hole Size" at 391.22,5703.94 h72
  text "Plated" at 1510.89,5703.94 h72
  text "Hole Type" at 2016.77,5703.94 h72
  text "Drill Layer Pair" at 2750.57,5703.94 h72
  text "Via/Pad" at 4250.12,5703.94 h72
  text "Pad Shape" at 4839.97,5703.94 h72
  text "Template" at 5585.77,5703.94 h72
  text "Hole Length" at 6725.44,5703.94 h72
  text "Routed Path Length" at 7815.12,5703.94 h72
  text "2" at -198.62,5553.94 h60
  text "23.62mil (0.600mm)" at 391.22,5553.94 h60
  text "PTH" at 1510.89,5553.94 h60
  text "Slot" at 2016.77,5553.94 h60
  text "Top Layer - Bottom Layer" at 2750.57,5553.94 h60
  text "Pad" at 4250.12,5553.94 h60
  text "Rounded" at 4839.97,5553.94 h60
  text "r90_170h60_140r100" at 5585.77,5553.94 h60
  text "55.12mil (1.400mm)" at 6725.44,5553.94 h60
  text "31.50mil (0.800mm)" at 7815.12,5553.94 h60
  text "2" at -198.62,5403.94 h60
  text "23.62mil (0.600mm)" at 391.22,5403.94 h60
  text "PTH" at 1510.89,5403.94 h60
  text "Slot" at 2016.77,5403.94 h60
  text "Top Layer - Bottom Layer" at 2750.57,5403.94 h60
  text "Pad" at 4250.12,5403.94 h60
  text "Rounded" at 4839.97,5403.94 h60
  text "(Mixed)" at 5585.77,5403.94 h60
  text "66.93mil (1.700mm)" at 6725.44,5403.94 h60
  text "43.31mil (1.100mm)" at 7815.12,5403.94 h60
  text "2" at -198.62,5253.94 h60
  text "24.41mil (0.620mm)" at 391.22,5253.94 h60
  text "NPTH" at 1510.89,5253.94 h60
  text "Round" at 2016.77,5253.94 h60
  text "Top Layer - Bottom Layer" at 2750.57,5253.94 h60
  text "Pad" at 4250.12,5253.94 h60
  text "Rounded" at 4839.97,5253.94 h60
  text "c0hn62" at 5585.77,5253.94 h60
  text "-" at 6725.44,5253.94 h60
  text "-" at 7815.12,5253.94 h60
  text "4" at -198.62,5103.94 h60
  text "118.11mil (3.000mm)" at 391.22,5103.94 h60
  text "PTH" at 1510.89,5103.94 h60
  text "Round" at 2016.77,5103.94 h60
  text "Top Layer - Bottom Layer" at 2750.57,5103.94 h60
  text "Pad" at 4250.12,5103.94 h60
  text "Rounded" at 4839.97,5103.94 h60
  text "c500h300" at 5585.77,5103.94 h60
  text "-" at 6725.44,5103.94 h60
  text "-" at 7815.12,5103.94 h60
  text "5" at -198.62,4953.94 h60
  text "37.40mil (0.950mm)" at 391.22,4953.94 h60
  text "PTH" at 1510.89,4953.94 h60
  text "Round" at 2016.77,4953.94 h60
  text "Top Layer - Bottom Layer" at 2750.57,4953.94 h60
  text "Pad" at 4250.12,4953.94 h60
  text "(Mixed)" at 4839.97,4953.94 h60
  text "(Mixed)" at 5585.77,4953.94 h60
  text "-" at 6725.44,4953.94 h60
  text "-" at 7815.12,4953.94 h60
  text "6" at -198.62,4803.94 h60
  text "35.43mil (0.900mm)" at 391.22,4803.94 h60
  text "PTH" at 1510.89,4803.94 h60
  text "Round" at 2016.77,4803.94 h60
  text "Top Layer - Bottom Layer" at 2750.57,4803.94 h60
  text "Pad" at 4250.12,4803.94 h60
  text "(Mixed)" at 4839.97,4803.94 h60
  text "(Mixed)" at 5585.77,4803.94 h60
  text "-" at 6725.44,4803.94 h60
  text "-" at 7815.12,4803.94 h60
  text "8" at -198.62,4653.94 h60
  text "40.35mil (1.025mm)" at 391.22,4653.94 h60
  text "PTH" at 1510.89,4653.94 h60
  text "Round" at 2016.77,4653.94 h60
  text "Top Layer - Bottom Layer" at 2750.57,4653.94 h60
  text "Pad" at 4250.12,4653.94 h60
  text "Rounded" at 4839.97,4653.94 h60
  text "c168h102x0" at 5585.77,4653.94 h60
  text "-" at 6725.44,4653.94 h60
  text "-" at 7815.12,4653.94 h60
  text "73" at -198.62,4503.94 h60
  text "11.81mil (0.300mm)" at 391.22,4503.94 h60
  text "PTH" at 1510.89,4503.94 h60
  text "Round" at 2016.77,4503.94 h60
  text "Top Layer - Bottom Layer" at 2750.57,4503.94 h60
  text "Via" at 4250.12,4503.94 h60
  text "Rounded" at 4839.97,4503.94 h60
  text "v60h30" at 5585.77,4503.94 h60
  text "-" at 6725.44,4503.94 h60
  text "-" at 7815.12,4503.94 h60
  text "102 Total" at -198.62,4353.94 h60
  text "Slot definitions :" at -704.5,4208.97 h60
  text "Routed Path Length" at 328.19,4208.97 h60
  text "= Calculated from tool start centre position to tool end centre position." at 1430.86,4208.97 h60
  text "Hole Length" at 328.19,4108.99 h60
  text "= Routed Path Length + Tool Size = Slot length as defined in the PCB layout" at 1020.99,4108.99 h60

## Dimensions
2408,3.15 to 0,0 on DIMENSION
2410.69,2243.91 to 2408,3.15 on DIMENSION
1201.69,1127.06 to -550.98,-625.61 on DIMENSION

## Text inside footprints (layer, text, board x,y; h text height)
J2: Top Overlay "Board Edge" at -500.34,1296.24 h28 r270